# Altium PCB 8_1000M_Switch_VT1.1.PcbDoc (part 3 of 3)
Units mil, origin at the board's own origin, x right, y up, seen from the top; angles counter-clockwise.
Board outline 6257.04 x 4516.14 mil, 2 copper layers (Top Layer, Bottom Layer); 180 components, 239 nets, 766 pads, 500 vias.
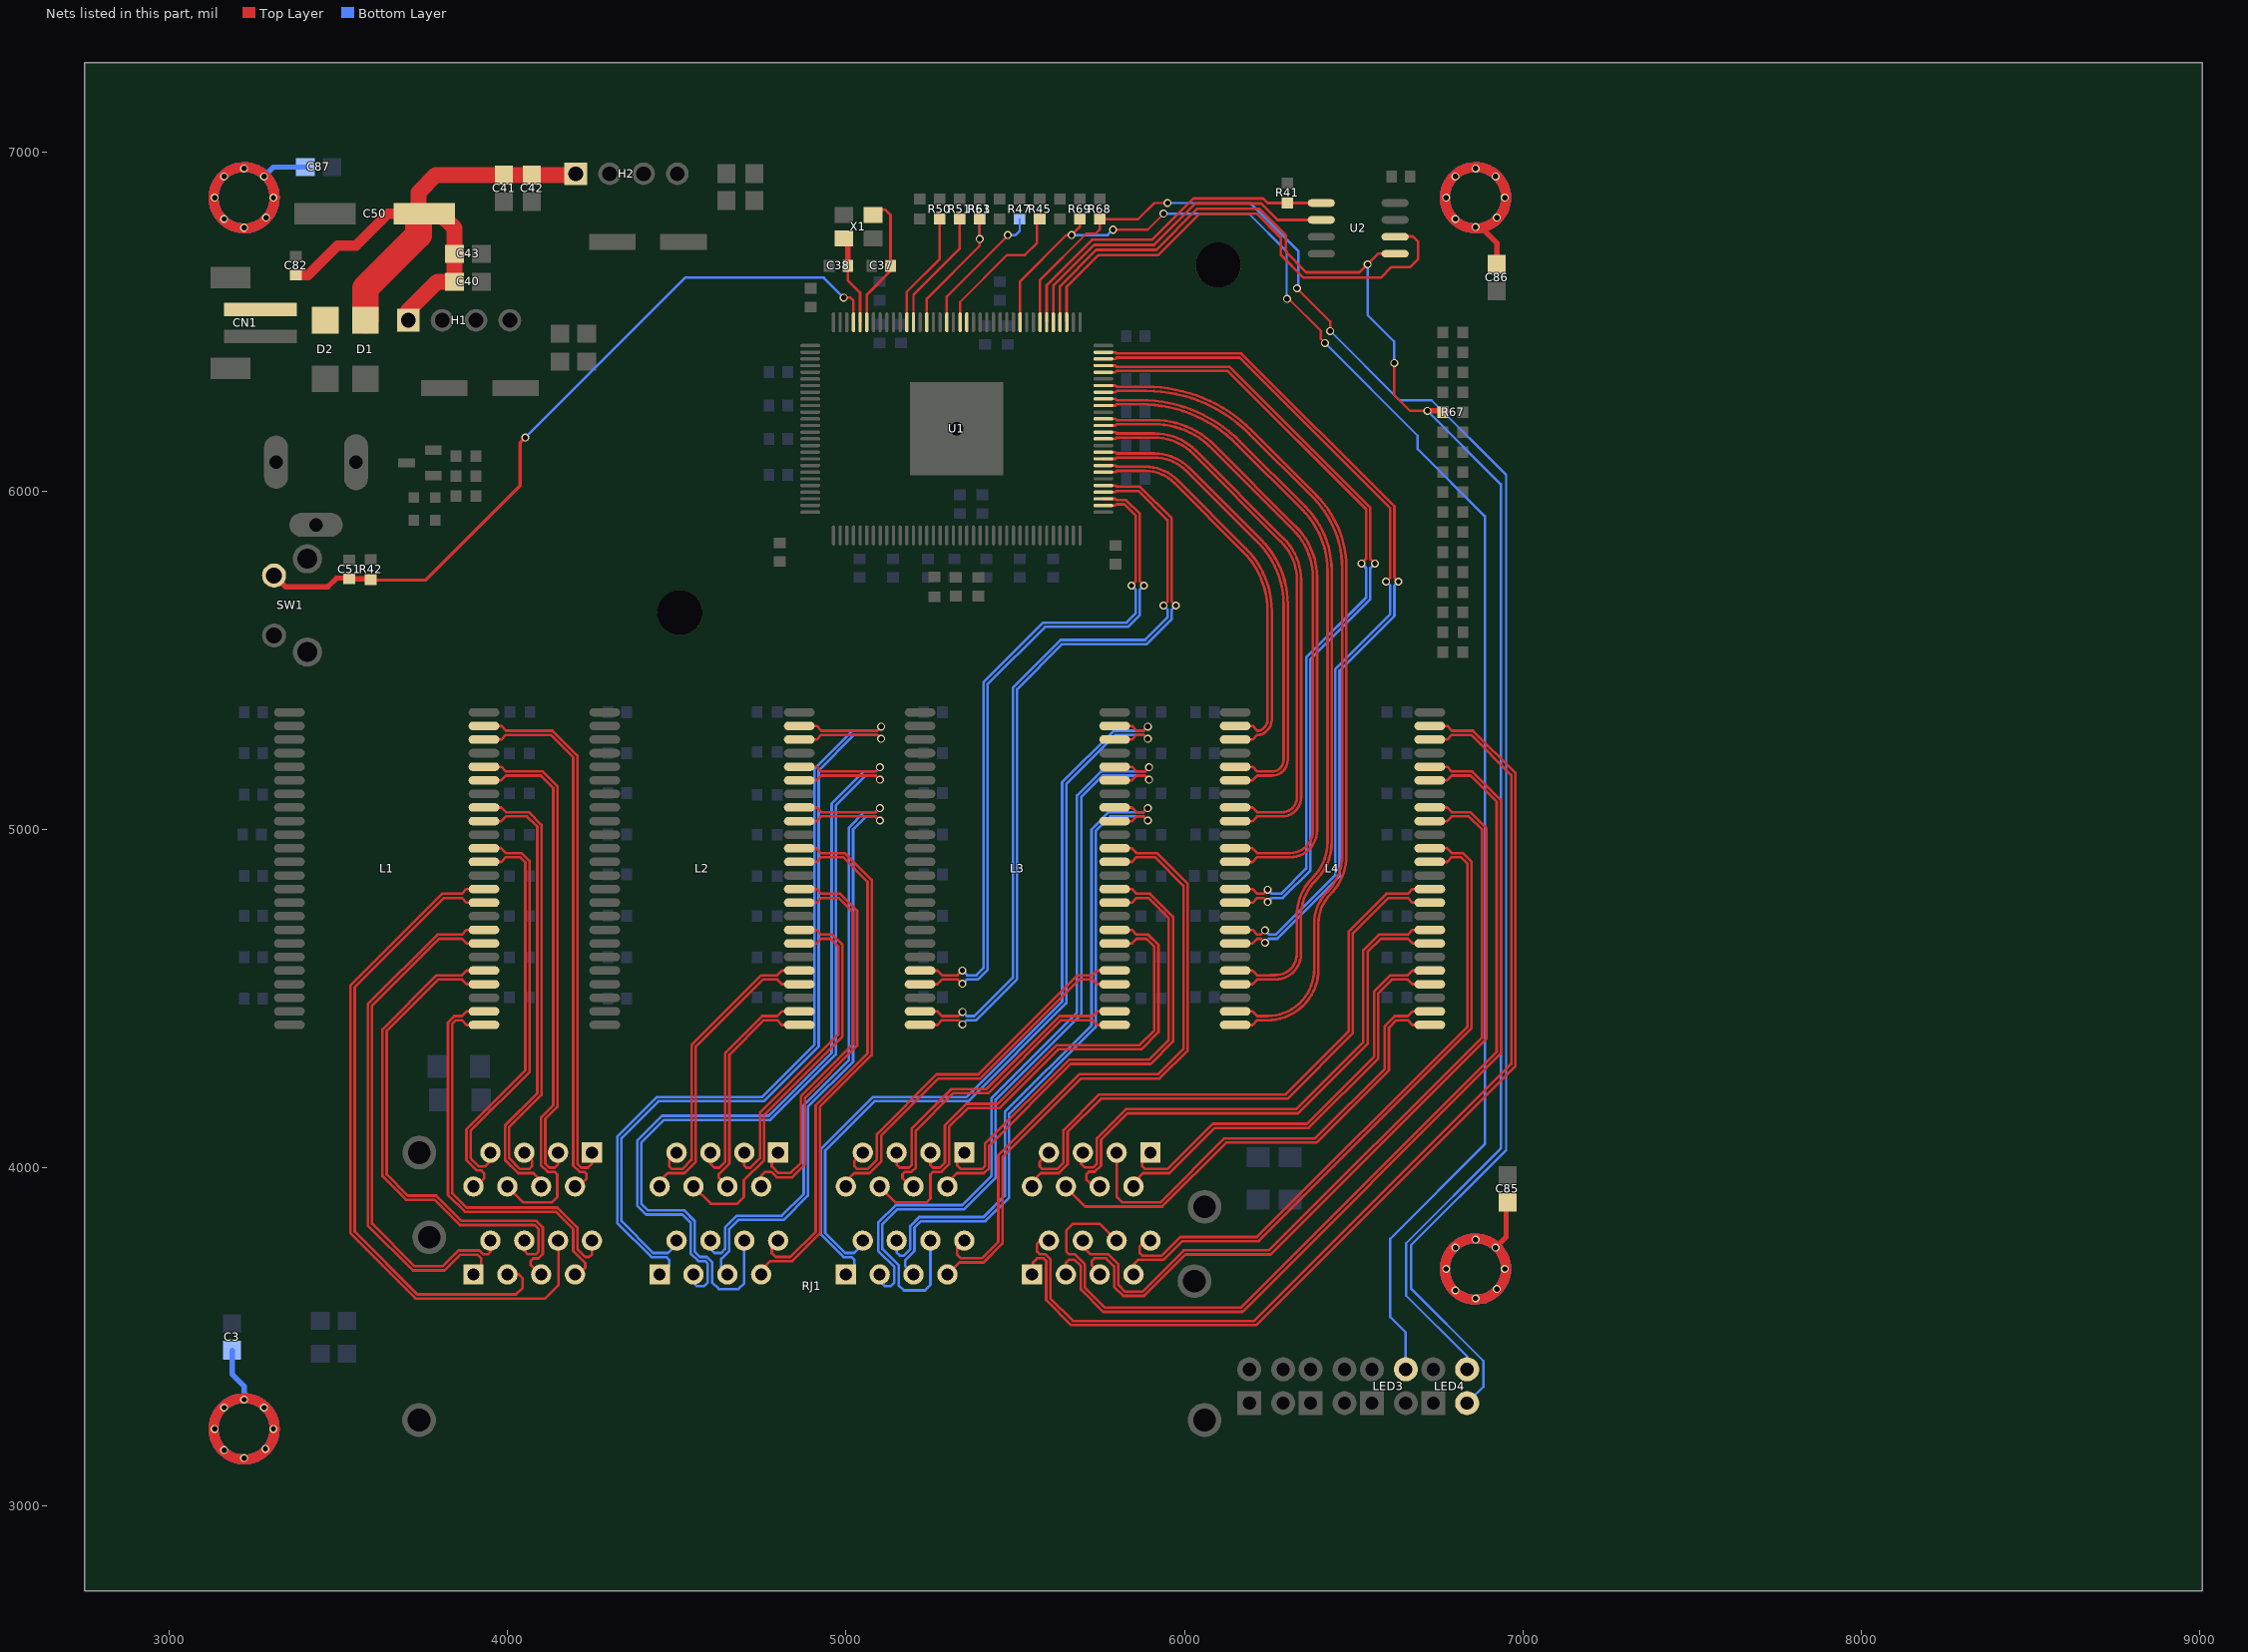
[diagram p3: the nets of this part, all layers, seen from the top]

## Via types
v1: diameter 23.62, hole 15.75, Top Layer to Bottom Layer, 457 vias
v2: diameter 31.5, hole 23.62, Top Layer to Bottom Layer, 28 vias
v3: diameter 19.68, hole 11.81, Top Layer to Bottom Layer, 15 vias

## Nets (pads, with @x,y where several pads share a name; then routed paths per layer and width w, separated by ;. In a path a pad name is that pad's centre, name@x,y a point inside that pad or via, vN(x,y) a via of type N, cw(c..) or ccw(c..) an arc to the next point about the centre after c; other vN are vias at no path point) (continued)
P5C_N: L3.21 U1.41 | length 2042
  Top Layer w7.76: L3.21@5218.49,4542.73 5269.67,4542.73 5283.58,4556.64 5330.71,4556.64 v1(5343.65,4543.7) ; U1.41@5760.07,5976.89 5795.47,5976.89 5799.17,5973.19 5827.55,5973.19 5867.74,5932.99 5867.74,5732.68 v1(5879.99,5720.43)
  Bottom Layer w7.76: v1(5343.65,4543.7) 5356.59,4556.64 5389.71,4556.64 5418.45,4585.38 5418.45,5429.53 5587.74,5598.82 5833.46,5598.82 5867.74,5633.1 5867.74,5708.19 v1(5879.99,5720.43)
P5C_P: L3.20 U1.40 | length 2002.3
  Top Layer w7.76: L3.20@5218.49,4582.83 5269.67,4582.83 5283.58,4568.93 5329.5,4568.93 v1(5343.65,4583.07) ; U1.40@5760.07,5957.2 5795.47,5957.2 5799.17,5960.9 5822.44,5960.9 5855.46,5927.88 5855.46,5732.68 v1(5843.22,5720.43)
  Bottom Layer w7.76: v1(5343.65,4583.07) 5357.8,4568.93 5384.62,4568.93 5406.15,4590.46 5406.15,5434.6 5582.66,5611.1 5828.37,5611.1 5855.46,5638.19 5855.46,5708.19 v1(5843.22,5720.43)
P5D_N: L3.24 U1.43 | length 2302.6
  Top Layer w7.76: L3.24@5218.49,4422.23 5269.67,4422.23 5283.58,4436.14 5331.84,4436.14 v1(5344.08,4423.9) ; U1.43@5760.07,6016.26 5795.47,6016.26 5799.17,6012.56 5868.55,6012.56 5962.23,5918.87 5962.23,5673.62 v1(5974.48,5661.38)
  Bottom Layer w7.76: v1(5344.08,4423.9) 5356.33,4436.14 5384.17,4436.14 5505.07,4557.04 5505.07,5413.78 5638.93,5547.64 5888.58,5547.64 5962.23,5621.29 5962.23,5649.13 v1(5974.48,5661.38)
P5D_P: L3.23 U1.42 | length 2261.9
  Top Layer w7.76: L3.23@5218.49,4462.33 5269.67,4462.33 5283.58,4448.43 5331.84,4448.43 v1(5344.08,4460.67) ; U1.42@5760.07,5996.57 5795.47,5996.57 5799.17,6000.27 5863.46,6000.27 5949.95,5913.78 5949.95,5673.62 v1(5937.71,5661.38)
  Bottom Layer w7.76: v1(5344.08,4460.67) 5356.33,4448.43 5379.08,4448.43 5492.77,4562.11 5492.77,5418.85 5633.85,5559.94 5883.51,5559.94 5949.95,5626.38 5949.95,5649.13 v1(5937.71,5661.38)
P5LED0: LED3.4 R69.1 U1.74 | length 4778.3
  Top Layer w7.09: U1.74@5514.01,6498.54 5514.01,6619.57 5650.74,6756.3 v1(5666.48,6756.3) 5690.1,6779.92 R69.1@5690.1,6803.4 ; v1(5788.53,6772.05) 5890.89,6772.05 v1(5938.14,6819.29) ; v1(6302.3,6567.32) 6308.23,6567.32 6402.71,6472.84 6402.71,6449.21 v1(6414.52,6437.4)
  Bottom Layer w7.09: v1(5666.48,6756.3) 5772.78,6756.3 v1(5788.53,6772.05) ; v1(5938.14,6819.29) 6190.11,6819.29 6301.52,6707.88 6301.52,6568.09 v1(6302.3,6567.32) ; v1(6414.52,6437.4) 6688.56,6163.36 6688.56,6123.99 6886.96,5925.59 6886.96,4069.7 6607.43,3790.18 6607.43,3559.45 6653.49,3513.39 LED3.4@6653.49,3404.72
P6A_N: L4.3 U1.46 | length 1182.8
  Top Layer w7.76: U1.46@5760.07,6075.31 5795.47,6075.31 5799.17,6071.61 5884.39,6071.61 cw(c5884.39,5938.77) 5978.32,6032.7 6181.08,5829.95 cw(c5996.55,5645.42) 6257.51,5645.42 6257.51,5322.55 cw(c6218.34,5322.55) 6246.04,5294.86 6239.2,5288.02 cw(c6218.61,5308.61) 6218.61,5279.49 6214.73,5279.49 6200.77,5265.53 L4.3@6149.6,5265.53
P6A_P: L4.2 U1.45 | length 1144.3
  Top Layer w7.76: U1.45@5760.07,6055.63 5795.47,6055.63 5799.17,6059.33 5884.39,6059.33 cw(c5884.39,5938.77) 5969.63,6024.02 6172.39,5821.26 cw(c5996.55,5645.42) 6245.23,5645.42 6245.23,5322.55 cw(c6218.34,5322.55) 6237.35,5303.54 6230.51,5296.71 cw(c6218.61,5308.61) 6218.61,5291.78 6214.73,5291.78 6200.77,5305.73 L4.2@6149.6,5305.73
P6B_N: L4.6 U1.48 | length 1425.9
  Top Layer w7.76: U1.48@5760.07,6114.68 5795.47,6114.68 5799.17,6110.98 5910.32,6110.98 cw(c5910.32,5964.7) 6013.75,6068.14 6225.99,5855.9 cw(c6035.84,5665.75) 6304.75,5665.75 6304.75,5205.12 cw(c6258.63,5205.12) 6258.63,5158.99 6214.73,5158.99 6200.77,5145.03 L4.6@6149.6,5145.03
P6B_P: L4.5 U1.47 | length 1387.3
  Top Layer w7.76: U1.47@5760.07,6095 5795.47,6095 5799.17,6098.7 5910.32,6098.7 cw(c5910.32,5964.7) 6005.07,6059.45 6217.3,5847.21 cw(c6035.84,5665.75) 6292.47,5665.75 6292.47,5205.12 cw(c6258.63,5205.12) 6258.63,5171.28 6214.73,5171.28 6200.77,5185.23 L4.5@6149.6,5185.23
P6C_N: L4.9 U1.51 | length 1666.6
  Top Layer w7.76: U1.51@5760.07,6173.74 5795.47,6173.74 5799.17,6170.04 5910.99,6170.04 cw(c5910.99,5996.87) 6033.44,6119.32 6293.2,5859.56 cw(c6170.26,5736.62) 6344.12,5736.62 6344.12,5094.88 cw(c6287.78,5094.88) 6287.78,5038.54 6214.68,5038.54 6200.77,5024.63 L4.9@6149.6,5024.63
P6C_P: L4.8 U1.50 | length 1628
  Top Layer w7.76: U1.50@5760.07,6154.05 5795.47,6154.05 5799.17,6157.75 5910.99,6157.75 cw(c5910.99,5996.87) 6024.75,6110.63 6284.51,5850.87 cw(c6170.26,5736.62) 6331.84,5736.62 6331.84,5094.88 cw(c6287.78,5094.88) 6287.78,5050.83 6214.68,5050.83 6200.77,5064.73 L4.8@6149.6,5064.73
P6D_N: L4.12 U1.53 | length 1896.9
  Top Layer w7.76: U1.53@5760.07,6213.11 5795.47,6213.11 5799.17,6209.41 5908.85,6209.41 ; 5908.85,6209.52 cw(c5910.58,5959.62) 5910.58,6209.53 cw(c5910.58,5959.63) 6087.29,6136.33 6328.71,5894.91 cw(c6177.46,5743.65) 6391.37,5743.65 6391.37,4997.25 cw(c6312.15,4997.25) 6312.15,4918.04 6214.68,4918.04 6200.77,4904.13 L4.12@6149.6,4904.13
P6D_P: L4.11 U1.52 | length 1858.3
  Top Layer w7.76: U1.52@5760.07,6193.42 5795.47,6193.42 5799.17,6197.12 5910.53,6197.12 ; 5910.58,6197.25 cw(c5910.58,5959.63) 6078.6,6127.65 6320.03,5886.22 cw(c6177.46,5743.65) 6379.08,5743.65 6379.08,4997.25 cw(c6312.15,4997.25) 6312.15,4930.33 6214.68,4930.33 6200.77,4944.23 L4.11@6149.6,4944.23
P6LED0: LED4.2 R68.1 U1.71 | length 5001.5
  Top Layer w7.09: U1.71@5573.06,6498.54 5573.06,6623.5 5709.79,6760.24 5737.35,6760.24 5749.16,6772.04 R68.1@5749.16,6803.4 5863.19,6803.4 5910.58,6850.79 v1(5949.95,6850.79) ; v1(6331.84,6598.82) 6430.26,6500.4 v1(6430.26,6472.84)
  Bottom Layer w7.09: v1(5949.95,6850.79) 6194.04,6850.79 6335.78,6709.06 6335.78,6602.76 v1(6331.84,6598.82) ; v1(6430.26,6472.84) 6634.99,6268.11 6729.48,6268.11 6949.95,6047.64 6949.95,4052.37 6668.85,3771.27 6668.85,3643.7 6883.02,3429.53 6883.02,3353.15 LED4.2@6834.6,3304.72
P7A_N: L4.21 U1.56 | length 2320.2
  Top Layer w7.76: U1.56@5760.07,6272.16 5795.47,6272.16 5799.17,6268.46 5869.83,6268.46 cw(c5869.83,5853.34) 6163.36,6146.88 6355.91,5954.32 cw(c6165.76,5764.17) 6434.67,5764.17 6434.67,4963.21 cw(c6274.53,4963.21) 6387.77,4849.98 ccw(c6494.28,4743.46) 6343.65,4743.46 6343.65,4631.82 cw(c6268.84,4631.82) 6268.84,4557 6261.22,4557 6260.86,4556.64 6214.68,4556.64 6200.77,4542.73 L4.21@6149.6,4542.73
P7A_P: L4.20 U1.55 | length 2281.7
  Top Layer w7.76: U1.55@5760.07,6252.48 5795.47,6252.48 5799.17,6256.18 5869.83,6256.18 cw(c5869.83,5853.34) 6154.67,6138.19 6347.23,5945.64 cw(c6165.76,5764.17) 6422.39,5764.17 6422.39,4963.21 cw(c6274.53,4963.21) 6379.08,4858.66 ccw(c6494.28,4743.46) 6331.37,4743.46 6331.37,4631.82 cw(c6268.84,4631.82) 6268.84,4569.29 6253.25,4569.29 6253.1,4569.14 6253.1,4568.93 6214.68,4568.93 6200.77,4582.83 L4.20@6149.6,4582.83
P7B_N: L4.24 U1.58 | length 2528.4
  Top Layer w7.76: U1.58@5760.07,6311.53 5795.47,6311.53 5799.17,6307.83 5885.22,6307.83 ; 5885.22,6307.95 cw(c5886.98,5868.04) 5886.96,6307.95 cw(c5886.96,5867.96) 6198.08,6179.08 6387.77,5989.4 cw(c6169.98,5771.6) 6477.98,5771.6 6477.98,4922.68 cw(c6315.07,4922.68) 6430.26,4807.48 ccw(c6514.67,4723.08) 6395.3,4723.08 6395.3,4587.01 cw(c6244.44,4587.01) 6244.44,4436.14 6214.68,4436.14 6200.77,4422.23 L4.24@6149.6,4422.23
P7B_P: L4.23 U1.57 | length 2489.8
  Top Layer w7.76: U1.57@5760.07,6291.85 5795.47,6291.85 5799.17,6295.55 5886.91,6295.55 ; 5886.96,6295.67 cw(c5886.96,5867.96) 6189.4,6170.4 6379.08,5980.71 cw(c6169.98,5771.6) 6465.7,5771.6 6465.7,4922.68 cw(c6315.07,4922.68) 6421.58,4816.17 ccw(c6514.67,4723.08) 6383.02,4723.08 6383.02,4587.01 cw(c6244.44,4587.01) 6244.44,4448.43 6214.68,4448.43 6200.77,4462.33 L4.23@6149.6,4462.33
P7C_N: L4.15 U1.61 | length 2389.8
  Top Layer w7.76: U1.61@5760.07,6370.59 5795.47,6370.59 5799.05,6367.01 6132.2,6367.01 6548.85,5950.36 6548.85,5799.12 v1(6562.15,5785.82) ; L4.15@6149.6,4783.63 6200.77,4783.63 6214.73,4797.59 6233.41,4797.59 v1(6245.46,4785.54)
  Bottom Layer w7.76: v1(6245.46,4785.54) 6257.51,4797.59 6289.68,4797.59 6371.68,4879.59 6371.68,5503.16 6548.85,5680.33 6548.85,5772.53 v1(6562.15,5785.82)
P7C_P: L4.14 U1.60 | length 2349.5
  Top Layer w7.76: U1.60@5760.07,6350.9 5795.47,6350.9 5799.17,6354.6 5839.66,6354.6 ; 5839.71,6354.73 6127.11,6354.73 6536.56,5945.28 6536.56,5799.61 v1(6522.78,5785.82) ; L4.14@6149.6,4823.83 6200.77,4823.83 6214.73,4809.88 6233.41,4809.88 v1(6245.46,4821.92)
  Bottom Layer w7.76: v1(6245.46,4821.92) 6257.51,4809.88 6284.6,4809.88 6359.4,4884.68 6359.4,5508.27 6536.56,5685.43 6536.56,5772.03 v1(6522.78,5785.82)
P7D_N: L4.18 U1.63 | length 2618.9
  Top Layer w7.76: U1.63@5760.07,6409.96 5795.47,6409.96 5799.17,6406.26 6167.76,6406.26 6619.71,5954.3 6619.71,5744.49 v1(6631.76,5732.44) ; L4.18@6149.6,4663.13 6200.77,4663.13 6214.73,4677.09 6225.54,4677.09 v1(6237.59,4665.04)
  Bottom Layer w7.76: v1(6237.59,4665.04) 6249.63,4677.09 6273.94,4677.09 6457.82,4860.98 6457.82,5468.9 6619.71,5630.79 6619.71,5720.39 v1(6631.76,5732.44)
P7D_P: L4.17 U1.62 | length 2578.2
  Top Layer w7.76: U1.62@5760.07,6390.27 5795.47,6390.27 5799.17,6393.97 6162.67,6393.97 6607.43,5949.21 6607.43,5744.49 v1(6595.38,5732.44) ; L4.17@6149.6,4703.33 6200.77,4703.33 6214.73,4689.38 6225.54,4689.38 v1(6237.59,4701.42)
  Bottom Layer w7.76: v1(6237.59,4701.42) 6249.63,4689.38 6268.85,4689.38 6445.52,4866.05 6445.52,5473.97 6607.43,5635.88 6607.43,5720.39 v1(6595.38,5732.44)
P7LED0: LED4.4 R67.1 U1.68 U2.5 | length 5015.7
  Top Layer w7.09: v1(6619.24,6378.35) 6619.24,6283.86 6666.49,6236.62 v1(6717.67,6236.62)
  Top Layer w7.87: U1.68@5632.12,6498.54 5632.12,6605.29 5739.07,6712.25 5916.18,6712.25 6038.19,6834.25 6219.93,6834.25 6299.6,6754.58 6299.6,6705.87 6359.4,6646.06 6516.88,6646.06 v1(6540.5,6669.69) 6571.8,6700.99 U2.5@6621.91,6700.99
  Top Layer w15.75: v1(6717.67,6236.62) 6758.87,6236.62 R67.1@6762.81,6232.68
  Bottom Layer w7.09: v1(6540.5,6669.69) 6540.5,6520.08 6619.24,6441.34 v1(6619.24,6378.35) ; v1(6717.67,6236.62) 6934.2,6020.08 6934.2,4056.7 6654.67,3777.17 6654.67,3622.44 6834.6,3442.52 LED4.4@6834.6,3404.72
PGND: C3.2 C85.2 C86.2 C87.2 | length 5141.8
  Top Layer w15.75: v1(6859.4,6779.92) 6875.14,6779.92 6922.39,6732.68 C86.2@6922.39,6669.69 ; v1(6918.45,3764.18) 6949.95,3795.67 C85.2@6949.95,3901.97
  Top Layer w29.53: v1@3312.15,3228.74 ccw(c3221.6,3228.74) v1@3312.15,3228.74 ; v1@3312.15,6866.54 ccw(c3221.6,6866.54) v1@3312.15,6866.54 ; v1@6949.95,3701.18 ccw(c6859.4,3701.18) v1@6949.95,3701.18 ; v1@6949.95,6866.54 ccw(c6859.4,6866.54) v1@6949.95,6866.54
  Bottom Layer w15.75: C3.2@3186.17,3461.02 3186.17,3390.16 3221.6,3354.72 v1(3221.6,3315.36) ; v1(3280.66,6929.53) 3308.22,6957.09 C87.2@3402.7,6957.09
  Bottom Layer w29.53: v1@3312.15,3228.74 ccw(c3221.6,3228.74) v1@3312.15,3228.74 ; v1@3312.15,6866.54 ccw(c3221.6,6866.54) v1@3312.15,6866.54 ; v1@6949.95,3701.18 ccw(c6859.4,3701.18) v1@6949.95,3701.18 ; v1@6949.95,6866.54 ccw(c6859.4,6866.54) v1@6949.95,6866.54
  other v1: 3221.6,3142.13 3162.55,3165.75 3284.59,3169.69 3134.99,3228.74 3308.22,3228.74 3162.55,3291.73 3280.66,3291.73 6859.4,3614.57 6800.34,3638.19 6922.39,3642.13 6772.78,3701.18 6946.01,3701.18 6800.34,3764.18 6859.4,3787.8 3221.6,6777.94 3162.55,6803.55 6800.34,6803.55 3286.56,6807.47 6922.39,6807.48 3134.99,6866.54 3308.22,6866.54 6772.78,6866.54 6946.01,6866.54 3162.55,6929.53 6800.34,6929.53 6918.45,6929.53 3221.6,6953.15 6859.4,6953.15
R0A_N: L1.31 RJ1.A2 | length 1524.6
  Top Layer w7.76: L1.31@3930.26,4663.13 3879.09,4663.13 3865.13,4677.09 3797.58,4677.09 3599.55,4479.06 3599.55,3835.04 3725.54,3709.06 3808.22,3709.06 3855.12,3755.96 3916.48,3755.96 3927.95,3744.49 3941.51,3744.49 3949.27,3752.24 RJ1.A2@3949.27,3785
R0A_P: L1.32 RJ1.A1 | length 1559.5
  Top Layer w7.76: RJ1.A1@3899.27,3685 3922.39,3708.12 3922.39,3732.68 3911.39,3743.68 3860.23,3743.68 3813.33,3696.77 3720.45,3696.77 3587.27,3829.95 3587.27,4484.17 3792.47,4689.38 3865.13,4689.38 3879.09,4703.33 L1.32@3930.26,4703.33
R0B_N: L1.35 RJ1.A6 | length 2087.4
  Top Layer w7.76: L1.35@3930.26,4823.83 3879.09,4823.83 3865.13,4809.88 3806.67,4809.88 3536.09,4539.29 3536.09,3806.33 3728.32,3614.09 4110.89,3614.09 4150.74,3653.94 4150.74,3783.53 RJ1.A6@4149.27,3785
R0B_P: L1.34 RJ1.A3 | length 1878.2
  Top Layer w7.76: L1.34@3930.26,4783.63 3879.09,4783.63 3865.13,4797.59 3811.78,4797.59 3548.37,4534.18 3548.37,3811.42 3733.4,3626.39 4024.77,3626.39 4044.44,3646.06 4044.44,3673.62 4032.63,3685.43 3999.7,3685.43 RJ1.A3@3999.27,3685
R0C_N: L1.28 RJ1.A5 | length 1483.5
  Top Layer w7.76: L1.28@3930.26,4542.73 3879.09,4542.73 3865.18,4556.64 3795.24,4556.64 3642.86,4404.26 3642.86,3980.71 3705.36,3918.21 3789.19,3918.21 3864,3843.4 4084.94,3843.4 4103.96,3824.38 4103.96,3745.8 4090.35,3732.19 4075.44,3732.19 4068.06,3724.8 4068.06,3712.99 4096.05,3685 RJ1.A5@4099.27,3685
R0C_P: L1.29 RJ1.A4 | length 1477.9
  Top Layer w7.76: L1.29@3930.26,4582.83 3879.09,4582.83 3865.18,4568.93 3790.13,4568.93 3630.58,4409.37 3630.58,3975.62 3700.29,3905.91 3784.12,3905.91 3858.92,3831.1 4079.87,3831.1 4091.68,3819.29 4091.68,3752.36 4083.81,3744.49 4060.18,3744.49 4049.27,3755.41 RJ1.A4@4049.27,3785
R0D_N: L1.25 RJ1.A8 | length 1176.3
  Top Layer w7.76: L1.25@3930.26,4422.23 3879.09,4422.23 3865.18,4436.14 3847.97,4436.14 3836.26,4424.43 3836.26,3925.1 3878.59,3882.77 4147.46,3882.77 4206.33,3823.91 4206.33,3759.76 4229.48,3736.61 4241.29,3736.61 4249.27,3744.59 RJ1.A8@4249.27,3785
R0D_P: L1.26 RJ1.A7 | length 1208.8
  Top Layer w7.76: L1.26@3930.26,4462.33 3879.09,4462.33 3865.18,4448.43 3842.86,4448.43 3823.96,4429.53 3823.96,3920.03 3873.52,3870.47 4142.39,3870.47 4194.04,3818.82 4194.04,3754.68 4229.48,3719.24 4229.48,3704.24 4210.24,3685 RJ1.A7@4199.27,3685
R1A_N: L1.46 RJ1.B2 | length 1609.8
  Top Layer w7.76: L1.46@3930.26,5265.53 3981.44,5265.53 3995.4,5279.49 4127.54,5279.49 4194.04,5212.99 4194.04,4006.64 4212.59,3988.09 4226.03,3988.09 4233.41,3980.71 4233.41,3968.18 4210.24,3945 RJ1.B2@4199.27,3945
R1A_P: L1.47 RJ1.B1 | length 1604
  Top Layer w7.76: L1.47@3930.26,5305.73 3981.44,5305.73 3995.4,5291.78 4132.63,5291.78 4206.33,5218.08 4206.33,4011.73 4217.66,4000.39 4237.35,4000.39 4249.27,4012.31 RJ1.B1@4249.27,4045
R1B_N: L1.43 RJ1.B6 | length 1654.7
  Top Layer w7.76: L1.43@3930.26,5145.03 3981.44,5145.03 3995.4,5158.99 4098.44,5158.99 4134.99,5122.44 4134.99,4185.43 4099.08,4149.53 4099.08,4007.12 4118.09,3988.11 4138.92,3988.11 4146.8,3980.24 4146.8,3913.78 4131.05,3898.03 4046.24,3898.03 RJ1.B6@3999.27,3945
R1B_P: L1.44 RJ1.B3 | length 1452.4
  Top Layer w7.76: L1.44@3930.26,5185.23 3981.44,5185.23 3995.4,5171.28 4103.53,5171.28 4147.27,5127.53 4147.27,4180.35 4111.37,4144.44 4111.37,4012.2 4123.18,4000.39 4138.92,4000.39 4149.27,4010.74 RJ1.B3@4149.27,4045
R1C_N: L1.41 RJ1.B5 | length 1349.1
  Top Layer w7.76: L1.41@3930.26,5064.73 3981.44,5064.73 3995.35,5050.83 4062.56,5050.83 4100.03,5013.36 4100.03,4215.78 4005.07,4120.82 4005.07,4027.95 4036.56,3996.46 4064.12,3996.46 4072,4004.33 4072,4022.27 RJ1.B5@4049.27,4045
R1C_P: L1.40 RJ1.B4 | length 1348.8
  Top Layer w7.76: L1.40@3930.26,5024.63 3981.44,5024.63 3995.35,5038.54 4057.47,5038.54 4087.74,5008.27 4087.74,4220.87 3992.78,4125.91 3992.78,4022.86 4031.47,3984.17 4076.41,3984.17 4099.27,3961.31 RJ1.B4@4099.27,3945
R1D_N: L1.37 RJ1.B8 | length 1210.6
  Top Layer w7.76: RJ1.B8@3899.27,3945 3906.37,3945 3931.42,3970.05 3931.42,3983.49 3922.88,3992.03 3909.44,3992.03 3878.61,4022.86 3878.61,4114.09 4052.31,4287.8 4052.31,4901.97 4036.24,4918.04 3995.35,4918.04 3981.44,4904.13 L1.37@3930.26,4904.13
R1D_P: L1.38 RJ1.B7 | length 1200.8
  Top Layer w7.76: L1.38@3930.26,4944.23 3981.44,4944.23 3995.35,4930.33 4041.33,4930.33 4064.59,4907.06 4064.59,4282.71 3890.89,4109.01 3890.89,4027.95 3914.52,4004.33 3934.2,4004.33 3949.27,4019.4 RJ1.B7@3949.27,4045
R2A_N: L2.46 RJ1.C2 | length 2464.8
  Top Layer w7.76: L2.46@4861.83,5265.53 4913.01,5265.53 4926.97,5279.49 5091.68,5279.49 v1(5103.73,5267.44)
  Bottom Layer w7.76: RJ1.C2@4499.27,3785 4499.27,3774.03 4473.66,3748.43 4430.26,3748.43 4336.26,3842.42 4336.26,4087.5 4445.54,4196.77 4756.56,4196.77 4918.94,4359.15 4918.94,5174.11 5024.32,5279.49 5091.68,5279.49 v1(5103.73,5267.44)
R2A_P: L2.47 RJ1.C1 | length 2520.4
  Top Layer w7.76: L2.47@4861.83,5305.73 4913.01,5305.73 4926.97,5291.78 5091.68,5291.78 v1(5103.73,5303.82)
  Bottom Layer w7.76: RJ1.C1@4449.27,3685 4477.51,3713.24 4477.51,3728.27 4469.63,3736.14 4425.18,3736.14 4323.96,3837.35 4323.96,4092.57 4440.45,4209.06 4751.45,4209.06 4906.64,4364.25 4906.64,5179.18 5019.23,5291.78 5091.68,5291.78 v1(5103.73,5303.82)
R2B_N: L2.43 RJ1.C6 | length 2649.4
  Top Layer w7.76: L2.43@4861.83,5145.03 4913.01,5145.03 4926.97,5158.99 5087.74,5158.99 v1(5099.79,5146.94)
  Bottom Layer w7.76: RJ1.C6@4699.27,3785 4699.27,3659.16 4682.23,3642.13 4623.65,3642.13 4603.96,3661.81 4603.96,3721.54 4588.89,3736.61 4568.53,3736.61 4552.78,3752.36 4552.78,3843.59 4521.97,3874.41 4414.52,3874.41 4395.32,3893.61 4395.32,4075.21 4461.76,4141.65 4776.25,4141.65 4969.63,4335.04 4969.63,5071.26 5057.37,5158.99 5087.74,5158.99 v1(5099.79,5146.94)
R2B_P: L2.44 RJ1.C3 | length 2509.3
  Top Layer w7.76: L2.44@4861.83,5185.23 4913.01,5185.23 4926.97,5171.28 5087.74,5171.28 v1(5099.79,5183.32)
  Bottom Layer w7.76: RJ1.C3@4549.27,3685 4549.27,3660.92 4560.18,3650 4579.87,3650 4591.68,3661.81 4591.68,3716.46 4583.81,3724.33 4563.44,3724.33 4540.5,3747.27 4540.5,3838.5 4516.88,3862.13 4409.43,3862.13 4383.02,3888.53 4383.02,4080.28 4456.67,4153.94 4771.14,4153.94 4957.33,4340.13 4957.33,5076.33 5052.28,5171.28 5087.74,5171.28 v1(5099.79,5183.32)
R2C_N: L2.40 RJ1.C5 | length 1911.3
  Top Layer w7.76: L2.40@4861.83,5024.63 4913.01,5024.63 4926.92,5038.54 5087.74,5038.54 v1(5099.79,5026.49)
  Bottom Layer w7.76: RJ1.C5@4649.27,3685 4631.05,3703.22 4631.05,3731.05 4654.67,3754.68 4654.67,3819.29 4681.76,3846.38 4815.62,3846.38 4886.96,3917.72 4886.96,4179.85 5020.82,4313.71 5020.82,5000.39 5058.96,5038.54 5087.74,5038.54 v1(5099.79,5026.49)
R2C_P: L2.41 RJ1.C4 | length 1916.8
  Top Layer w7.76: L2.41@4861.83,5064.73 4913.01,5064.73 4926.92,5050.83 5087.74,5050.83 v1(5099.79,5062.87)
  Bottom Layer w7.76: RJ1.C4@4599.27,3785 4599.27,3760.52 4611.37,3748.43 4631.05,3748.43 4642.39,3759.76 4642.39,3824.38 4676.67,3858.66 4810.53,3858.66 4874.67,3922.8 4874.67,4184.96 5008.52,4318.8 5008.52,5005.47 5053.87,5050.83 5087.74,5050.83 v1(5099.79,5062.87)
R2D_N: L2.37 RJ1.C8 | length 1545.4
  Top Layer w7.76: RJ1.C8@4799.27,3785 4780.66,3766.39 4780.66,3748.31 4792.35,3736.61 4835.78,3736.61 4910.11,3810.94 4910.11,4184.96 5063.63,4338.49 5063.63,4845.69 4991.28,4918.04 4926.65,4918.04 4912.74,4904.13 L2.37@4861.83,4904.13
R2D_P: L2.38 RJ1.C7 | length 1591.8
  Top Layer w7.76: RJ1.C7@4749.27,3685 4749.27,3697.35 4776.25,3724.33 4840.86,3724.33 4922.39,3805.86 4922.39,4179.85 5075.93,4333.39 5075.93,4850.79 4996.4,4930.33 4925.53,4930.33 4911.62,4944.23 L2.38@4861.83,4944.23
R3A_N: L2.35 RJ1.D2 | length 1198.9
  Top Layer w7.76: RJ1.D2@4749.27,3945 4749.16,3945.11 4749.16,3976.77 4760.16,3987.77 4779.85,3987.77 4795.25,3972.36 4840.86,3972.36 4879.08,4010.58 4879.08,4207.41 5032.63,4360.95 5032.63,4760.24 4982.99,4809.88 4926.97,4809.88 4913.01,4823.83 L2.35@4861.83,4823.83
R3A_P: L2.34 RJ1.D1 | length 1140.4
  Top Layer w7.76: RJ1.D1@4799.27,4045 4780.66,4026.39 4780.66,4004.33 4800.34,3984.65 4835.78,3984.65 4866.8,4015.67 4866.8,4212.52 5020.33,4366.05 5020.33,4755.14 4977.88,4797.59 4926.97,4797.59 4913.01,4783.63 L2.34@4861.83,4783.63
R3B_N: L2.32 RJ1.D6 | length 1190
  Top Layer w7.76: RJ1.D6@4549.27,3945 4600.17,3894.09 4678.3,3894.09 4697.98,3913.78 4697.98,3963.34 4757.85,4023.2 4757.85,4157.06 4989.32,4388.53 4989.32,4659.5 4959.44,4689.38 4926.97,4689.38 4913.01,4703.33 L2.32@4861.83,4703.33
R3B_P: L2.31 RJ1.D3 | length 951
  Top Layer w7.76: RJ1.D3@4699.27,4045 4699.27,4006.98 4705.85,4000.39 4717.67,4000.39 4745.56,4028.29 4745.56,4162.15 4977.02,4393.61 4977.02,4654.43 4954.35,4677.09 4926.97,4677.09 4913.01,4663.13 L2.31@4861.83,4663.13
R3C_N: L2.26 RJ1.D5 | length 679.6
  Top Layer w7.76: RJ1.D5@4599.27,4045 4599.27,4012.49 4611.37,4000.39 4625.47,4000.39 4642.86,4017.79 4642.86,4338.98 4752.31,4448.43 4796.75,4448.43 4810.66,4462.33 L2.26@4861.83,4462.33
R3C_P: L2.25 RJ1.D4 | length 667.2
  Top Layer w7.76: RJ1.D4@4649.27,3945 4623.85,3970.42 4623.85,3981.38 4655.15,4012.68 4655.15,4333.86 4757.42,4436.14 4796.75,4436.14 4810.66,4422.23 L2.25@4861.83,4422.23
R3D_N: L2.28 RJ1.D8 | length 880
  Top Layer w7.76: RJ1.D8@4449.27,3945 4449.27,3960.34 4473.1,3984.17 4521.97,3984.17 4556.25,4018.46 4556.25,4358.66 4754.23,4556.64 4796.75,4556.64 4810.66,4542.73 L2.28@4861.83,4542.73
R3D_P: L2.29 RJ1.D7 | length 879.4
  Top Layer w7.76: RJ1.D7@4499.27,4045 4477.51,4023.24 4477.51,4004.33 4485.38,3996.46 4516.88,3996.46 4543.96,4023.54 4543.96,4363.75 4749.14,4568.93 4796.75,4568.93 4810.66,4582.83 L2.29@4861.83,4582.83
R4A_N: L3.46 RJ1.E2 | length 2355.4
  Top Layer w7.76: L3.46@5793.29,5265.53 5844.47,5265.53 5858.43,5279.49 5879.08,5279.49 v1(5891.13,5267.44)
  Bottom Layer w7.76: RJ1.E2@5049.27,3785 5049.27,3774.03 5023.66,3748.43 4997.19,3748.43 4938.14,3807.48 4938.14,4051.1 5083.81,4196.77 5360.55,4196.77 5650.74,4486.96 5650.74,5134.25 5795.98,5279.49 5879.08,5279.49 v1(5891.13,5267.44)
R4A_P: L3.47 RJ1.E1 | length 2407.1
  Top Layer w7.76: L3.47@5793.29,5305.73 5844.47,5305.73 5858.43,5291.78 5879.08,5291.78 v1(5891.13,5303.82)
  Bottom Layer w7.76: RJ1.E1@4999.27,3685 5024.75,3710.48 5024.75,3728.27 5016.88,3736.14 4992.1,3736.14 4925.85,3802.39 4925.85,4056.19 5078.72,4209.06 5355.46,4209.06 5638.44,4492.03 5638.44,5139.32 5790.89,5291.78 5879.08,5291.78 v1(5891.13,5303.82)
R4B_N: L3.43 RJ1.E6 | length 2402.6
  Top Layer w7.76: L3.43@5793.29,5145.03 5844.47,5145.03 5858.43,5158.99 5883.02,5158.99 v1(5895.07,5146.94)
  Bottom Layer w7.76: RJ1.E6@5249.27,3785 5249.27,3654.04 5233.41,3638.19 5170.42,3638.19 5155.15,3653.46 5155.15,3712.52 5107.43,3760.24 5107.43,3833.42 5151.89,3877.87 5348.74,3877.87 5442.08,3971.21 5442.08,4201.18 5694.53,4453.64 5694.52,5095.36 5758.15,5158.99 5883.02,5158.99 v1(5895.07,5146.94)
R4B_P: L3.44 RJ1.E3 | length 2250.7
  Top Layer w7.76: L3.44@5793.29,5185.23 5844.47,5185.23 5858.43,5171.28 5883.02,5171.28 v1(5895.07,5183.32)
  Bottom Layer w7.76: RJ1.E3@5099.27,3685 5099.27,3666.04 5115.3,3650 5131.05,3650 5142.86,3661.81 5142.86,3707.43 5095.15,3755.15 5095.15,3838.5 5146.8,3890.16 5343.65,3890.16 5429.79,3976.3 5429.79,4206.29 5682.23,4458.73 5682.24,5100.45 5753.06,5171.28 5883.02,5171.28 v1(5895.07,5183.32)
R4C_N: L3.40 RJ1.E5 | length 1950.2
  Top Layer w7.76: L3.40@5793.29,5024.63 5844.47,5024.63 5858.38,5038.54 5879.08,5038.54 v1(5891.13,5026.49)
  Bottom Layer w7.76: RJ1.E5@5199.27,3685 5174.36,3709.91 5174.36,3727.12 5201.92,3754.68 5201.92,3823.23 5221.13,3842.44 5411.26,3842.44 5481.45,3912.63 5481.45,4160.16 5737.35,4416.07 5737.35,4994.81 5781.08,5038.54 5879.08,5038.54 v1(5891.13,5026.49)
R4C_P: L3.41 RJ1.E4 | length 1961.3
  Top Layer w7.76: L3.41@5793.29,5064.73 5844.47,5064.73 5858.38,5050.83 5879.08,5050.83 v1(5891.13,5062.87)
  Bottom Layer w7.76: RJ1.E4@5149.27,3785 5149.27,3749.89 5158.61,3740.55 5170.42,3740.55 5189.63,3759.76 5189.63,3828.32 5216.04,3854.72 5406.17,3854.72 5469.16,3917.72 5469.16,4165.28 5725.05,4421.16 5725.05,4999.91 5775.97,5050.83 5879.08,5050.83 v1(5891.13,5062.87)
R4D_N: L3.37 RJ1.E8 | length 1855.4
  Top Layer w7.76: RJ1.E8@5349.27,3785 5327.9,3763.63 5327.9,3744.49 5339.71,3732.68 5401.08,3732.68 5449.48,3781.07 5449.48,4036.98 5688.97,4276.47 5921.23,4276.47 5996.7,4351.95 5996.7,4833.88 5912.55,4918.04 5858.38,4918.04 5844.47,4904.13 L3.37@5793.29,4904.13
R4D_P: L3.38 RJ1.E7 | length 1885.2
  Top Layer w7.76: RJ1.E7@5299.27,3685 5299.91,3685 5335.3,3720.39 5406.17,3720.39 5461.76,3775.98 5461.76,4031.89 5694.04,4264.17 5926.3,4264.17 6009,4346.87 6009,4838.98 5917.66,4930.33 5858.38,4930.33 5844.47,4944.23 L3.38@5793.29,4944.23
R5A_N: L3.35 RJ1.F2 | length 1464.6
  Top Layer w7.76: RJ1.F2@5299.27,3945 5299.27,3955.97 5327.47,3984.17 5407.32,3984.17 5422.39,3999.24 5422.39,4065.68 5663.71,4306.99 5899.9,4306.99 5965.7,4372.79 5965.7,4742.18 5898,4809.88 5858.43,4809.88 5844.47,4823.83 L3.35@5793.29,4823.83
R5A_P: L3.34 RJ1.F1 | length 1427.9
  Top Layer w7.76: RJ1.F1@5349.27,4045 5341.01,4045 5327.9,4031.89 5327.9,4008.27 5339.71,3996.46 5402.23,3996.46 5410.11,4004.33 5410.11,4070.79 5658.61,4319.29 5894.83,4319.29 5953.4,4377.86 5953.4,4737.1 5892.91,4797.59 5858.43,4797.59 5844.47,4783.63 L3.34@5793.29,4783.63
R5B_N: L3.32 RJ1.F6 | length 1563.2
  Top Layer w7.76: RJ1.F6@5099.27,3945 5146.24,3898.03 5237.35,3898.03 5249.16,3909.84 5249.16,3980.24 5257.04,3988.11 5281.81,3988.11 5304.28,4010.58 5304.28,4120.79 5360.56,4177.07 5453.4,4177.07 5626.63,4350.3 5872.34,4350.3 5922.86,4400.82 5922.86,4659.03 5892.51,4689.38 5858.43,4689.38 5844.47,4703.33 L3.32@5793.29,4703.33
R5B_P: L3.31 RJ1.F3 | length 1314.6
  Top Layer w7.76: RJ1.F3@5249.27,4045 5249.27,4008.16 5257.04,4000.39 5276.72,4000.39 5292,4015.67 5292,4125.91 5355.46,4189.37 5448.3,4189.37 5621.53,4362.6 5867.27,4362.6 5910.58,4405.91 5910.58,4653.94 5887.43,4677.09 5858.43,4677.09 5844.47,4663.13 L3.31@5793.29,4663.13
R5C_N: L3.26 RJ1.F5 | length 937.2
  Top Layer w7.76: RJ1.F5@5149.27,4045 5149.27,4009.74 5158.61,4000.39 5185.7,4000.39 5193.57,4008.27 5193.57,4115.25 5311,4232.68 5414.52,4232.68 5630.26,4448.43 5728.21,4448.43 5742.11,4462.33 L3.26@5793.29,4462.33
R5C_P: L3.25 RJ1.F4 | length 939.5
  Top Layer w7.76: RJ1.F4@5199.27,3945 5190.38,3945 5166.48,3968.9 5166.48,3980.71 5173.87,3988.09 5192.71,3988.09 5205.85,4001.24 5205.85,4110.16 5316.07,4220.38 5419.61,4220.38 5635.38,4436.14 5728.21,4436.14 5742.11,4422.23 L3.25@5793.29,4422.23
R5D_N: L3.28 RJ1.F8 | length 1105.9
  Top Layer w7.76: RJ1.F8@4999.27,3945 4999.27,3959.16 5024.28,3984.17 5068.74,3984.17 5103.49,4018.93 5103.49,4094.88 5272.31,4263.7 5396.01,4263.7 5688.95,4556.64 5728.21,4556.64 5742.11,4542.73 L3.28@5793.29,4542.73
R5D_P: L3.29 RJ1.F7 | length 1110
  Top Layer w7.76: RJ1.F7@5049.27,4045 5024.75,4020.48 5024.75,4004.33 5032.63,3996.46 5063.65,3996.46 5091.21,4024.02 5091.21,4099.97 5267.22,4275.98 5390.89,4275.98 5683.83,4568.93 5728.21,4568.93 5742.11,4582.83 L3.29@5793.29,4582.83
R6A_N: L4.46 RJ1.G2 | length 3080
  Top Layer w7.76: RJ1.G2@5599.27,3785 5573.14,3785 5564.12,3775.98 5564.12,3752.72 5571.88,3744.96 5588.9,3744.96 5603.49,3730.36 5603.49,3614.57 5670.42,3547.64 6205.86,3547.64 6965.23,4307.01 6965.23,5160.64 6846.37,5279.49 6789.53,5279.49 6775.57,5265.53 L4.46@6724.4,5265.53
R6A_P: L4.47 RJ1.G1 | length 3109.2
  Top Layer w7.76: RJ1.G1@5549.27,3685 5552.31,3688.04 5552.31,3720.87 5564.12,3732.68 5583.81,3732.68 5591.21,3725.28 5591.21,3609.48 5665.33,3535.35 6210.94,3535.35 6977.51,4301.92 6977.51,5165.75 6851.48,5291.78 6789.53,5291.78 6775.57,5305.73 L4.47@6724.4,5305.73
R6B_N: L4.43 RJ1.G6 | length 2907.8
  Top Layer w7.76: RJ1.G6@5799.27,3785 5749.23,3835.04 5670.42,3835.04 5650.74,3815.35 5650.74,3752.36 5658.61,3744.49 5675.98,3744.49 5705.85,3714.62 5705.85,3646.06 5764.91,3587.01 6166.48,3587.01 6921.9,4342.42 6921.9,5081.91 6844.82,5158.99 6789.53,5158.99 6775.57,5145.03 L4.43@6724.4,5145.03
R6B_P: L4.44 RJ1.G3 | length 2743.2
  Top Layer w7.76: RJ1.G3@5649.27,3685 5649.27,3719.4 5658.61,3728.74 5674.36,3728.74 5693.57,3709.53 5693.57,3640.97 5759.82,3574.72 6171.57,3574.72 6934.2,4337.35 6934.2,5087.01 6849.94,5171.28 6789.53,5171.28 6775.57,5185.23 L4.44@6724.4,5185.23
R6C_N: L4.41 RJ1.G5 | length 2428.8
  Top Layer w7.76: RJ1.G5@5749.27,3685 5749.27,3689.26 5725.54,3712.99 5725.54,3724.8 5733.41,3732.68 5768.37,3732.68 5792,3709.06 5792,3648.85 5818.88,3621.97 5880.26,3621.97 6002.3,3744.02 6254.25,3744.02 6890.89,4380.66 6890.89,5004.31 6844.38,5050.83 6789.48,5050.83 6775.57,5064.73 L4.41@6724.4,5064.73
R6C_P: L4.40 RJ1.G4 | length 2388.7
  Top Layer w7.76: RJ1.G4@5699.27,3785 5699.27,3766.82 5721.13,3744.96 5773.46,3744.96 5804.28,3714.14 5804.28,3653.94 5823.97,3634.25 5875.15,3634.25 5997.19,3756.3 6249.16,3756.3 6878.59,4385.73 6878.59,4999.24 6839.29,5038.54 6789.48,5038.54 6775.57,5024.63 L4.40@6724.4,5024.63
R6D_N: L4.37 RJ1.G8 | length 1916.9
  Top Layer w7.76: RJ1.G8@5899.27,3785 5884.16,3785 5867.27,3768.11 5867.27,3748.43 5875.15,3740.55 5932.58,3740.55 5987.7,3795.67 6213.73,3795.67 6835.78,4417.72 6835.78,4898.36 6816.09,4918.04 6789.48,4918.04 6775.57,4904.13 L4.37@6724.4,4904.13
R6D_P: L4.38 RJ1.G7 | length 1948.9
  Top Layer w7.76: RJ1.G7@5849.27,3685 5849.27,3714.67 5862.86,3728.27 5937.67,3728.27 5992.78,3783.39 6218.82,3783.39 6848.06,4412.63 6848.06,4903.44 6821.18,4930.33 6789.48,4930.33 6775.57,4944.23 L4.38@6724.4,4944.23
R7A_N: L4.28 RJ1.H2 | length 1253.7
  Top Layer w7.76: RJ1.H2@5849.27,3945 5849.27,3955.97 5877.47,3984.17 5955.06,3984.17 6088.9,4118.02 6366.78,4118.02 6572,4323.23 6572,4516.14 6612.5,4556.64 6659.31,4556.64 6673.22,4542.73 L4.28@6724.4,4542.73
R7A_P: L4.29 RJ1.H1 | length 1259.1
  Top Layer w7.76: RJ1.H1@5899.27,4045 5875.15,4020.88 5875.15,4004.33 5883.02,3996.46 5949.95,3996.46 6083.81,4130.32 6361.71,4130.32 6559.71,4328.32 6559.71,4521.23 6607.41,4568.93 6659.31,4568.93 6673.22,4582.83 L4.29@6724.4,4582.83
R7B_N: L4.25 RJ1.H6 | length 1408.5
  Top Layer w7.76: RJ1.H6@5649.27,3945 5649.27,3942.81 5706.33,3885.75 5933.73,3885.75 6122.69,4074.71 6390.41,4074.71 6603.49,4287.8 6603.49,4413.78 6625.85,4436.14 6659.31,4436.14 6673.22,4422.23 L4.25@6724.4,4422.23
R7B_P: L4.26 RJ1.H3 | length 1369.8
  Top Layer w7.76: RJ1.H3@5799.27,4045 5799.27,3914.85 5816.09,3898.03 5928.64,3898.03 6117.62,4087.01 6385.33,4087.01 6591.21,4292.88 6591.21,4418.87 6620.77,4448.43 6659.31,4448.43 6673.22,4462.33 L4.26@6724.4,4462.33
R7C_N: L4.32 RJ1.H5 | length 1564.6
  Top Layer w7.76: RJ1.H5@5699.27,4045 5694.04,4039.78 5694.04,4012.2 5705.37,4000.88 5729.49,4000.88 5740.82,4012.2 5740.82,4088.16 5826.28,4173.62 6330.22,4173.62 6528.22,4371.62 6528.22,4643.28 6574.32,4689.38 6659.26,4689.38 6673.22,4703.33 L4.32@6724.4,4703.33
R7C_P: L4.31 RJ1.H4 | length 1576
  Top Layer w7.76: RJ1.H4@5749.27,3945 5729.75,3945 5709.79,3964.96 5709.79,3980.83 5717.55,3988.58 5734.56,3988.58 5753.1,4007.12 5753.1,4083.07 5831.35,4161.32 6335.29,4161.32 6540.5,4366.54 6540.5,4638.19 6579.4,4677.09 6659.26,4677.09 6673.22,4663.13 L4.31@6724.4,4663.13
R7D_N: L4.34 RJ1.H8 | length 1771.1
  Top Layer w7.76: RJ1.H8@5549.27,3945 5549.27,3958.66 5574.78,3984.17 5628.27,3984.17 5654.67,4010.58 5654.67,4106.22 5753.08,4204.63 6303.79,4204.63 6497.19,4398.03 6497.19,4693.31 6601.48,4797.59 6659.26,4797.59 6673.22,4783.63 L4.34@6724.4,4783.63
R7D_P: L4.35 RJ1.H7 | length 1779.3
  Top Layer w7.76: RJ1.H7@5599.27,4045 5572,4017.73 5572,4004.33 5579.87,3996.46 5623.18,3996.46 5642.39,4015.67 5642.39,4111.31 5748.01,4216.93 6298.72,4216.93 6484.91,4403.12 6484.91,4698.4 6596.39,4809.88 6659.26,4809.88 6673.22,4823.83 L4.35@6724.4,4823.83
RESET: C51.2 R42.1 SW1.1 U1.99 | length 2278.1
  Top Layer w7.87: v1(4993.26,6571.26) 5012.94,6571.26 5021.88,6562.33 U1.99@5021.88,6498.54
  Top Layer w9.84: R42.1@3597.45,5736.62 3757.03,5736.62 4036.56,6016.14 4036.56,6142.13 v1(4052.31,6157.88)
  Top Layer w15.75: SW1.1@3310.19,5750.4 3343.65,5716.93 3469.63,5716.93 3495.09,5742.39 C51.2@3534.46,5742.39 ; C51.2@3532.63,5740.55 3593.52,5740.55 R42.1@3597.45,5736.62
  Top Layer w23.62: C51.2@3532.63,5740.55 C51.2@3534.46,5742.39
  Bottom Layer w7.87: v1(4052.31,6157.88) 4524.75,6630.32 4934.2,6630.32 v1(4993.26,6571.26)
SLED_G1A: U1.82
SPI_F_CLK: U1.67 U2.6 | length 1490.4
  Top Layer w7.87: U1.67@5651.8,6498.54 5651.8,6603.82 5745.22,6697.25 5922.39,6697.25 6044.44,6819.29 6213.73,6819.29 6284.6,6748.43 6284.6,6697.25 6351.52,6630.32 6579.87,6630.32 6611.37,6661.81 6666.49,6661.81 6690.11,6685.43 6690.11,6736.62 6674.36,6752.36 6623.29,6752.36 U2.6@6621.91,6750.99
SPI_F_CS: R41.1 U1.70 U2.1 | length 1032.4
  Top Layer w7.87: U1.70@5592.75,6498.54 5592.75,6608.24 5726.75,6742.25 5903.75,6742.25 6025.68,6864.17 6232.43,6864.17 6245.62,6850.99 U2.1@6403.97,6850.99
SPI_F_D1: U1.69 U2.2 | length 1020.2
  Top Layer w7.87: U1.69@5612.43,6498.54 5612.43,6606.76 5732.91,6727.25 5909.96,6727.25 6031.93,6849.21 6226.18,6849.21 6274.41,6800.99 U2.2@6403.97,6800.99
STRP_DIS_8051: R47.2 U1.85 | length 407.8
  Top Layer w7.09: U1.85@5297.47,6498.54 5297.47,6574.47 5477.51,6754.51 v1(5477.51,6756.3)
  Bottom Layer w7.09: v1(5477.51,6756.3) 5501.13,6756.3 5512.94,6768.11 R47.2@5512.94,6803.28
STRP_EN_EEE: R51.1 U1.90 | length 361.6
  Top Layer w7.09: U1.90@5199.05,6498.54 5199.05,6580.2 5335.78,6716.93 R51.1@5335.78,6803.55
STRP_EN_PHY: R50.1 U1.91 | length 345.3
  Top Layer w7.09: U1.91@5179.36,6498.54 5179.36,6588.07 5276.72,6685.43 R50.1@5276.72,6803.55
STRP_EN_PWRLIGHT: R45.1 U1.83 | length 433.5
  Top Layer w7.09: U1.83@5336.84,6498.54 5336.84,6558.54 5475.54,6697.25 5528.69,6697.25 5564.12,6732.68 5564.12,6795.67 R45.1@5572,6803.55
STRP_SMI_SEL1: R53.1 R61.2 U1.88 | length 428.7
  Top Layer w7.09: U1.88@5238.42,6498.54 5238.42,6568.39 5394.83,6724.8 v1(5394.83,6744.49) R53.1@5394.83,6803.55
  Bottom Layer w7.09: v1(5394.83,6744.49) R61.2@5394.83,6803.4
VIN: C40.2 C41.2 C42.2 C43.2 C50.1 C82.2 CN1.2 D1.1 D2.1 H1.1 H2.1 | length 1850
  Top Layer w31.5: C82.2@3375.14,6638.19 3410.58,6638.19 3497.19,6724.8 3552.31,6724.8 3646.8,6819.29 C50.1@3737.15,6819.29
  Top Layer w47.24: H1.1@3706.64,6504.33 3706.64,6532.68 3792.47,6618.51 C40.2@3843.65,6618.51 C43.2@3843.65,6701.18 3843.65,6775.99 3800.34,6819.29 C50.1@3754.06,6819.29 3737.15,6819.29 3737.15,6882.08 3788.53,6933.47 C41.2@3989.32,6933.47 C42.2@4072,6933.47 4197.59,6933.47 H2.1@4201.52,6937.4
  Top Layer w78.74: D1.1@3579.87,6504.33 3579.87,6598.82 3737.15,6756.1 C50.1@3737.15,6819.29
XTALI: C38.1 U1.98 X1.1 | length 267.9
  Top Layer w7.87: C38.1@5005.07,6665.75 5005.07,6622.44 5041.57,6585.94 U1.98@5041.57,6498.54
  Top Layer w15.75: X1.1@4993.25,6746.46 5005.07,6734.64 C38.1@5005.07,6665.75
XTALO: C37.2 U1.97 X1.3 | length 403.4
  Top Layer w7.87: U1.97@5061.25,6498.54 5061.25,6580.2 5131.05,6650 5131.05,6815.36 5115.3,6831.1 X1.3@5079.87,6831.1
pads on no net: CN1.3 CN1.4 SW1.3 SW1.4 U1.65 U1.66 U1.72 U1.73 U1.75 U1.79 U1.81 U1.87 U1.93 U1.100 U1.101 U1.123 V1.1 V1.2
copper on no net: | length 63.1
  Top Layer w7.87: 5139.99,6498.54 5139.99,6540.82 v1(5154.67,6555.51)

## Polygon pours and split planes (outlines as drawn)
GND on Top Layer "Top Layer-GND" (solid, remove dead copper, pour order 0): 3072,3079.13 7009.01,3079.13 7009.01,7016.14 3072,7016.14
GND on Bottom Layer "Bottom Layer-GND" (solid, remove dead copper, pour order 4): 3072,3079.13 7009.01,3079.13 7009.01,7016.14 3072,7016.14

## Keep-outs
Board Outline Layer:
  circle w1: c3221.6,3228.74 r66.93
  circle w1: c6859.4,3701.18 r66.93
  circle w1: c3221.6,6866.54 r66.93
  circle w1: c6859.4,6866.54 r66.93
  lines w7.87: 3072,3228.74 ccw(c3221.6,3228.74) 3221.6,3079.13 6859.4,3079.13 ccw(c6859.4,3228.74) 7009,3228.74 7009,6866.54 ccw(c6859.4,6866.54) 6859.4,7016.14 3221.6,7016.14 ccw(c3221.6,6866.54) 3072,6866.54 3072,3228.74

## Other copper
Bottom Layer:
  text "AY08" at 3131.05,3964.96 h120 r270

## Silkscreen, mask and mechanical layers (free items; w line width, h text height)
Top Silkscreen Layer:
  circle w10: c3221.6,3228.74 r106.3
  circle w10: c6859.4,3701.18 r106.3
  circle w10: c3221.6,6866.54 r106.3
  circle w10: c6859.4,6866.54 r106.3
  lines w7.87: 3619.24,5709.05 4091.68,5709.05 4091.68,6575.2 3619.24,6575.2 3619.24,5709.05 ; 4115.3,6142.13 4587.74,6142.13 4587.74,7008.27 4115.3,7008.27 4115.3,6142.13
  text "拆开我干啥？ / 焊工不行？" at 4993.26,6327.17 h62.99 r270
  text "POWER_3.3V" at 4134.99,6150 h70.87
  text "POWER_1V" at 3670.42,5716.93 h70.87
  text "V1.1：修复第七口无法使用，以及RJ45指示灯从并口输出变成PnLED0" at 7300.34,5579.13 h78.74
  text "星火计划（自由赛道）" at 3115.3,4327.17 h78.74 r270
  text "8_1000M_Switch_VT1.0" at 3453.89,4256.3 h78.74 r270
  text "2023-05-26" at 3355.46,4252.36 h78.74 r270
  text "JLCJLCJLCJLC" at 4540.5,3350.79 h118.11
Bottom Silkscreen Layer:
  lines w23.62: 3871.21,3736.46 4276.72,3736.46 ; 3871.21,3996.46 4276.72,3996.46 ; 3949.95,3657.72 3949.95,3736.46 ; 3949.95,3917.72 3949.95,3996.46 ; 3999.16,3736.45 3999.16,3815.19 ; 3999.16,3996.45 3999.16,4075.19 ; 4050.25,3657.72 4050.25,3736.46 ; 4050.25,3917.72 4050.25,3996.46 ; 4099.55,3736.46 4099.55,3815.2 ; 4099.55,3996.46 4099.55,4075.2 ; 4150.73,3657.71 4150.73,3736.45 ; 4150.73,3917.71 4150.73,3996.45 ; 4197.98,3736.46 4197.98,3815.2 ; 4197.98,3996.46 4197.98,4075.2 ; 4421.21,3736.46 4826.72,3736.46 ; 4421.21,3996.46 4826.72,3996.46 ; 4499.95,3657.72 4499.95,3736.46 ; 4499.95,3917.72 4499.95,3996.46 ; 4549.16,3736.45 4549.16,3815.19 ; 4549.16,3996.45 4549.16,4075.19 ; 4600.25,3657.72 4600.25,3736.46 ; 4600.25,3917.72 4600.25,3996.46 ; 4649.55,3736.46 4649.55,3815.2 ; 4649.55,3996.46 4649.55,4075.2 ; 4700.73,3657.71 4700.73,3736.45 ; 4700.73,3917.71 4700.73,3996.45 ; 4747.98,3736.46 4747.98,3815.2 ; 4747.98,3996.46 4747.98,4075.2 ; 4971.21,3736.46 5376.72,3736.46 ; 4971.21,3996.46 5376.72,3996.46 ; 5049.95,3657.72 5049.95,3736.46 ; 5049.95,3917.72 5049.95,3996.46 ; 5099.16,3736.45 5099.16,3815.19 ; 5099.16,3996.45 5099.16,4075.19 ; 5150.25,3657.72 5150.25,3736.46 ; 5150.25,3917.72 5150.25,3996.46 ; 5199.55,3736.46 5199.55,3815.2 ; 5199.55,3996.46 5199.55,4075.2 ; 5250.73,3657.71 5250.73,3736.45 ; 5250.73,3917.71 5250.73,3996.45 ; 5297.98,3736.46 5297.98,3815.2 ; 5297.98,3996.46 5297.98,4075.2 ; 5521.21,3736.46 5926.72,3736.46 ; 5521.21,3996.46 5926.72,3996.46 ; 5599.95,3657.72 5599.95,3736.46 ; 5599.95,3917.72 5599.95,3996.46 ; 5649.16,3736.45 5649.16,3815.19 ; 5649.16,3996.45 5649.16,4075.19 ; 5700.25,3657.72 5700.25,3736.46 ; 5700.25,3917.72 5700.25,3996.46 ; 5749.55,3736.46 5749.55,3815.2 ; 5749.55,3996.46 5749.55,4075.2 ; 5800.73,3657.71 5800.73,3736.45 ; 5800.73,3917.71 5800.73,3996.45 ; 5847.98,3736.46 5847.98,3815.2 ; 5847.98,3996.46 5847.98,4075.2
Top Paste Mask Layer:
  circle w29.53: c6859.4,6866.54 r90.55
  circle w29.53: c6859.4,3701.18 r90.55
  circle w29.53: c3221.6,3228.74 r90.55
  circle w29.53: c3221.6,6866.54 r90.55
Bottom Paste Mask Layer:
  circle w29.53: c6859.4,6866.54 r90.55
  circle w29.53: c6859.4,3701.18 r90.55
  circle w29.53: c3221.6,3228.74 r90.55
  circle w29.53: c3221.6,6866.54 r90.55
  circle w29.53: c3221.6,6866.54 r90.55
Top Solder Mask Layer:
  circle w29.53: c6859.4,6866.54 r90.55
  circle w29.53: c6859.4,3701.18 r90.55
  circle w29.53: c3221.6,3228.74 r90.55
  circle w29.53: c3221.6,6866.54 r90.55
  circle w29.53: c3221.6,6866.54 r90.55
Bottom Solder Mask Layer:
  circle w29.53: c6859.4,6866.54 r90.55
  circle w29.53: c6859.4,3701.18 r90.55
  circle w29.53: c3221.6,3228.74 r90.55
  circle w29.53: c3221.6,6866.54 r90.55
Mechanical Layer:
  circle w1: c3221.6,3228.74 r66.93
  circle w1: c6859.4,3701.18 r66.93
  circle w1: c3221.6,6866.54 r66.93
  circle w1: c6859.4,6866.54 r66.93

## Text inside footprints (layer, text, board x,y; h text height)
R69: Top Paste Mask Layer "R70" at 5323.96,6980.71 h47.24 r90
RJ1: Top Silkscreen Layer "A/B" at 3999.27,4155 h50; Top Silkscreen Layer "C/D" at 4559.27,4165 h50; Top Silkscreen Layer "E/F" at 5129.27,4155 h50; Top Silkscreen Layer "G/H" at 5679.27,4155 h50; Top Silkscreen Layer "RJ45-8(2x4)" at 4589.27,3044.6 h50